# Altium PCB MT-20S4A.PcbDoc
Units mm, origin at the board's own origin, x right, y up, seen from the top; angles counter-clockwise.
Board outline 142 x 97 mm, 2 copper layers (Top Layer, Bottom Layer); 57 components, 71 nets, 348 pads, 324 vias.
Unrouted connection lines stored in the file: 32.
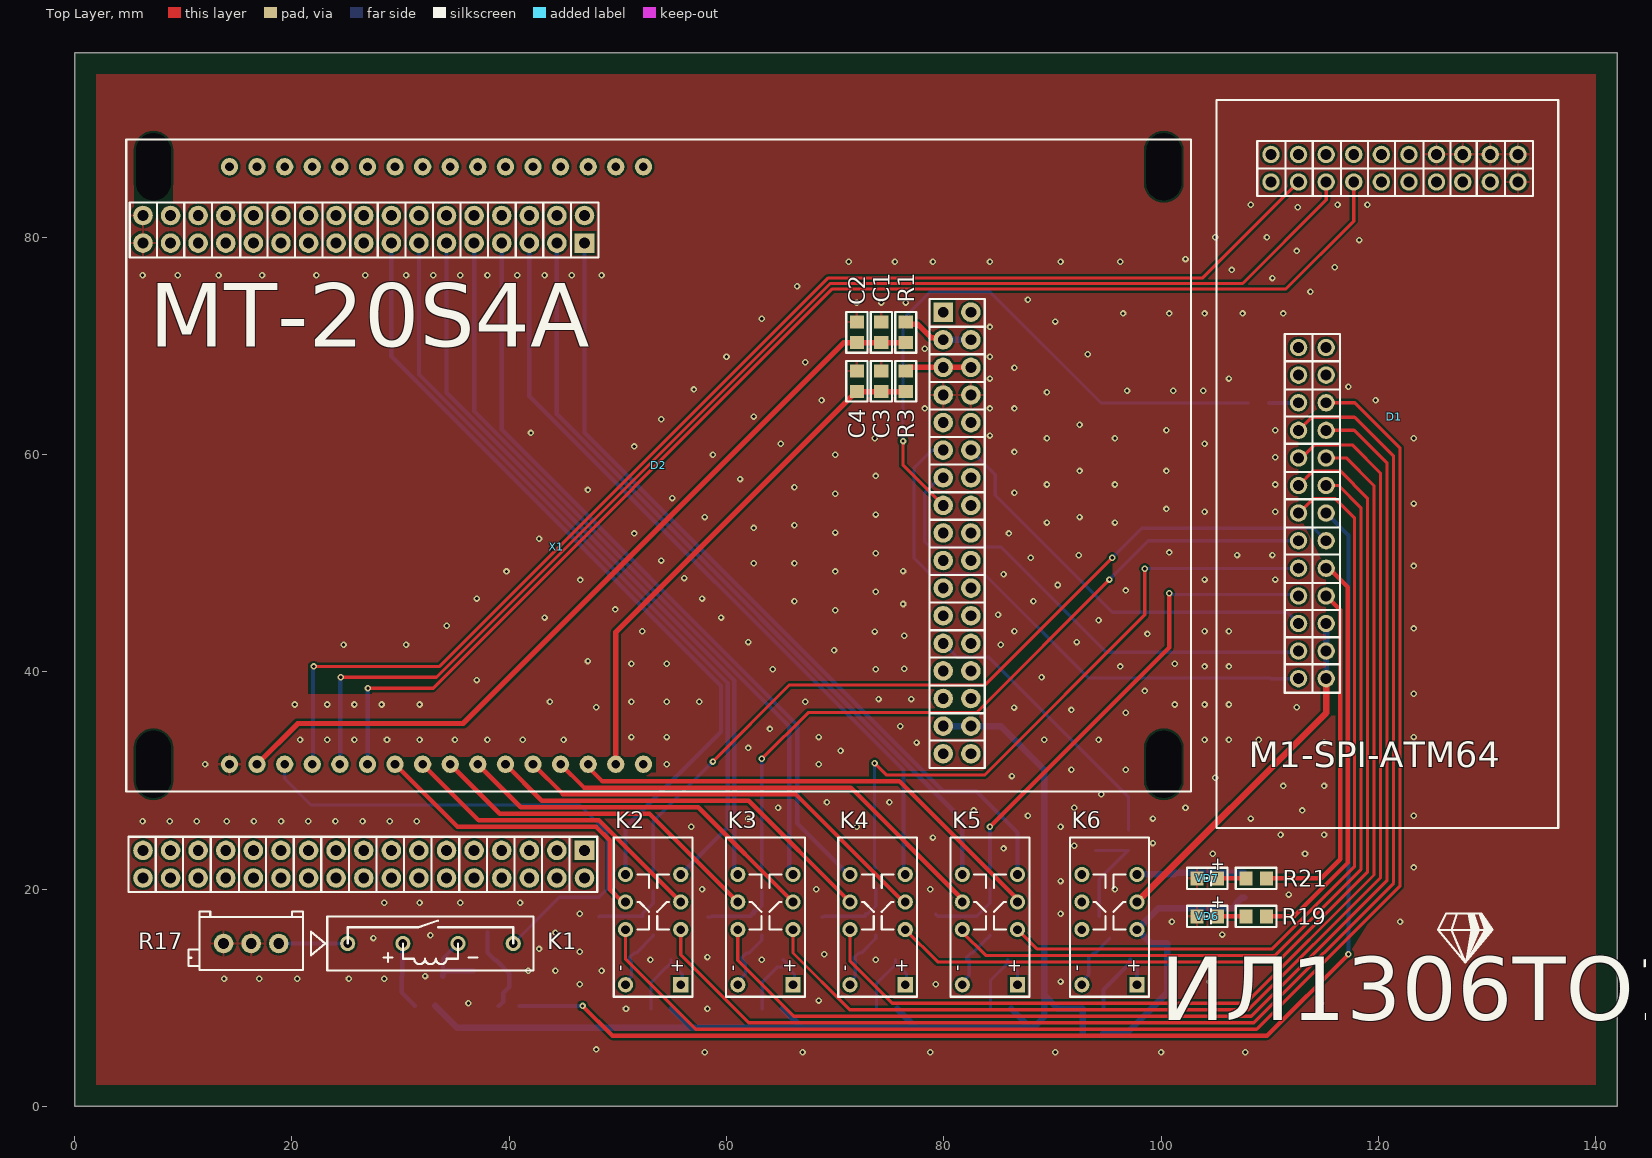
[diagram p0: Top Layer view]
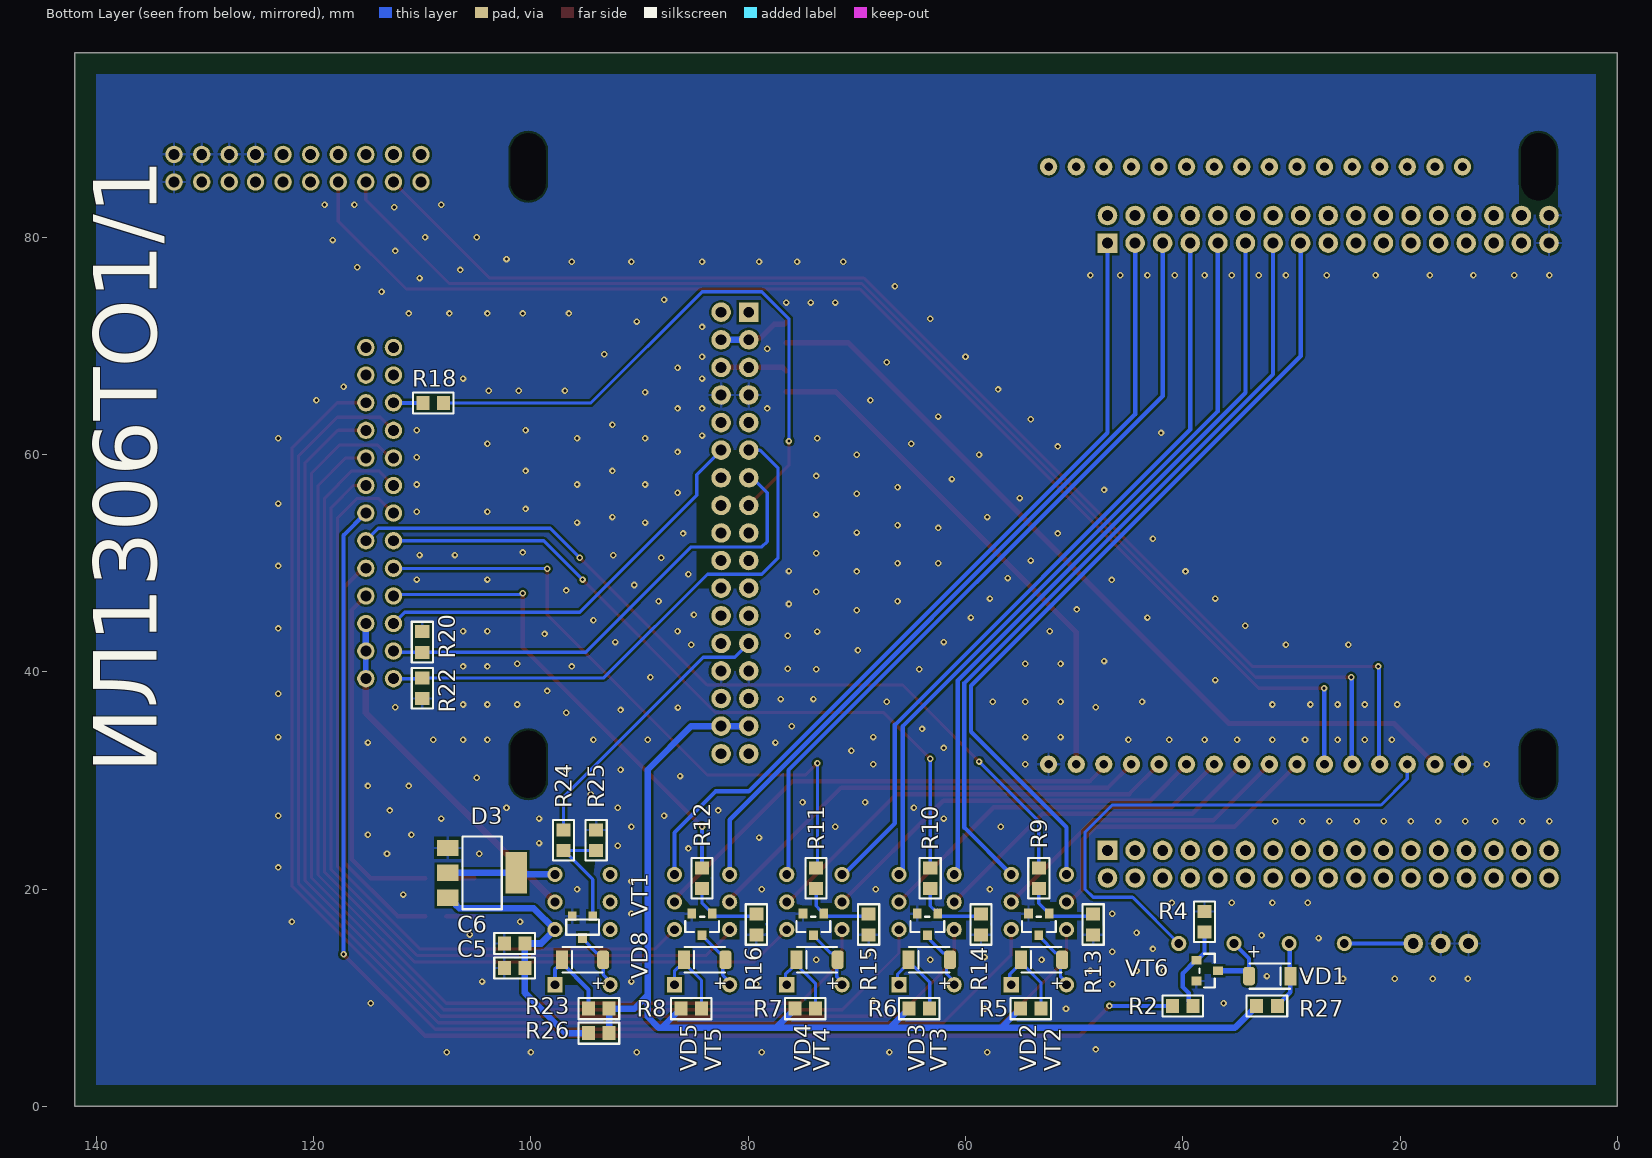
[diagram p1: Bottom Layer view, seen from below]

## Layer stack, top to bottom
Top Solder: solder mask 0.0102, Solder Resist, Dk 3.5
Top Layer: signal copper 0.0356
Dielectric 1: dielectric 0.32, FR-4, Dk 4.8
Bottom Layer: signal copper 0.0356
Bottom Solder: solder mask 0.0102, Solder Resist, Dk 3.5

## Board outline
0,0 142,0 142,97 0,97

## Design rules (kind name [scope] priority, off if disabled: settings)
Clearance [All] p1: gap=0.2 ignorepadtopadclearanceinfootprint=FALSE
HoleSize [All] p1: absolutevalues=TRUE maxlimit=10 minlimit=0.025 maxpercent=80.000 minpercent=20.000
PolygonConnect [All vs InNet('GND')  And  InComponentClass('All Components')] p1: connectstyle=Relief reliefconductorwidth=0.254 reliefentries=4 polygonreliefangle="90 Angle" airgapwidth=0.254
RoutingVias [All] p1: holewidth=0.6 width=1.2 viastyle="Through Hole" minholewidth=0.4 minwidth=0.8 maxholewidth=2.5 maxwidth=3
SilkToSilkClearance [All] p1: silktosilkclearance=0
SilkToSolderMaskClearance [IsPad] p1: minsilkscreentomaskgap=0 clearancetoexposedcopper=TRUE
SolderMaskExpansion [All] p1: expansion=0.102 istentingtop=FALSE
Width [All] p1: maxlimit=0.6 minlimit=0.3 preferedwidth=0.4
27 further rules are at their usual default settings.

## Classes and differential pairs
component class "Formula connector": X1

## Components (designator, comment, footprint, x,y, rotation, side; value= is the part's Value field where it differs from the comment)
C1 "47uF" 0805 74.25,71.25 r90 top
C2 "0.1uF" 0805 72,71.25 r90 top
C3 "10uF" 0805 74.25,66.75 r90 top
C4 "0.1uF" 0805 72,66.75 r90 top
C5 "10uF" 0805 101.5,12.75 r0 bottom
C6 "0.1uF" 0805 101.5,15 r0 bottom
D1 "M1-SPI-ATM64" M1-SPI-ATM64 112.657,85.097 r0 top locked
D2 "MT-20S4A" MT-20S4A 53.75,59 r0 top locked
D3 "LDO" SOT-223 104.5,21.5 r270 bottom
K1 "TRR1A05F00" TRR1A05F00 32.75,15 r0 top
K2 "V23079A1001B301 TE" V23079A1001B301 53.25,17.5 r90 top
K3 "V23079A1001B301 TE" V23079A1001B301 63.583,17.5 r90 top
K4 "V23079A1001B301 TE" V23079A1001B301 73.917,17.5 r90 top
K5 "V23079A1001B301 TE" V23079A1001B301 84.25,17.5 r90 top
K6 "V23079A1001B301 TE" V23079A1001B301 95.25,17.5 r90 top
R1 "0" 0805 76.5,71.25 r270 top
R2 "33k" 0805 40,9.25 r180 bottom
R3 "0" 0805 76.5,66.75 r270 top
R4 "20k" 0805 38,17 r270 bottom
R5 "33k" 0805 54,9 r180 bottom
R6 "33k" 0805 64.25,9 r180 bottom
R7 "33k" 0805 74.75,9 r180 bottom
R8 "33k" 0805 85.25,9 r180 bottom
R9 "4.7k" 0805 53.25,21 r270 bottom
R10 "4.7k" 0805 63.25,21 r270 bottom
R11 "4.7k" 0805 73.75,21 r270 bottom
R12 "4.7k" 0805 84.25,21 r270 bottom
R13 "20k" 0805 48.25,16.75 r270 bottom
R14 "20k" 0805 58.583,16.75 r270 bottom
R15 "20k" 0805 68.917,16.75 r270 bottom
R16 "20k" 0805 79.25,16.75 r270 bottom
R17 "3296X-1-503LF" 3296X-1-503LF 16.25,15 r0 top
R18 "100" 0805 109,64.75 r0 bottom
R19 "2.2k" 0805 108.75,17.5 r180 top
R20 "10k" 0805 110,42.75 r90 bottom
R21 "2.2k" 0805 108.75,21 r180 top
R22 "10k" 0805 110,38.5 r270 bottom
R23 "33k" 0805 93.75,9 r0 bottom
R24 "4.7k" 0805 97,24.5 r270 bottom
R25 "20k" 0805 94,24.5 r90 bottom
R26 "0" 0805 93.75,6.75 r0 bottom
R27 "33k" 0805 32.25,9.25 r180 bottom
VD1 "LL4148" SOD80C 32,12 r180 bottom
VD2 "LL4148 NXP" SOD80C 53,13.5 r0 bottom
VD3 "LL4148 NXP" SOD80C 63.333,13.5 r0 bottom
VD4 "LL4148 NXP" SOD80C 73.667,13.5 r0 bottom
VD5 "LL4148 NXP" SOD80C 84,13.5 r0 bottom
VD6 "LED(0805)" 0805(LED) 104.25,17.5 r180 top
VD7 "LED(0805)" 0805(LED) 104.25,21 r180 top
VD8 "LL4148 NXP" SOD80C 95.25,13.5 r0 bottom
VT1 "MMBT5551L" SOT-23#1 95.25,16.5 r0 bottom
VT2 "MMBT5551L" SOT-23#2 53.25,16.75 r0 bottom
VT3 "MMBT5551L" SOT-23#2 63.5,16.75 r0 bottom
VT4 "MMBT5551L" SOT-23#2 74,16.75 r0 bottom
VT5 "MMBT5551L" SOT-23#2 84.25,16.75 r0 bottom
VT6 "MMBT5551L" SOT-23#2 37.75,12.5 r270 bottom
X1 "FORMULA" FORMULA 34.75,50.25 r0 top locked

## Footprints (in the part's own frame and the unit in brackets; to place one, negate y for a bottom-side part, rotate by r counter-clockwise, add the part's x,y. Pads: shape width x height; smd on the part's side, far side on the other; paste and mask are expansions set on the pad)
0805 [mm]
  rect 1.2x1.3 smd: 1(-0.95,0) 2(0.95,0)
  silkscreen extent -1.87,-0.97 1.87,0.97, body extent -1.05,-0.63 0.95,0.63, height 0.55
0805(LED) [mm]
  rect 1.2x1.3 smd: 1(-0.95,0) 2(0.95,0)
  silkscreen extent -1.87,-0.97 1.87,0.97, body extent -1.03,-0.41 1.03,0.5, height 0.85
3296X-1-503LF [mm]
  round 1.8 hole 1: 1(2.54,0) 2(0,0) 3(-2.54,0)
  silkscreen extent -5.77,-2.45 4.76,2.95, body extent -6.34,-2.45 4.74,2.38, height 9.98
FORMULA [mm]
  rect 1.8x1.8 hole 1: 1(12.18,29.22) VDDF(12.18,-26.68) VEEF(45.2,22.86)
  round 1.8 hole 1: 2(9.64,29.22) 3(7.1,29.22) 4(4.56,29.22) 5(2.02,29.22) 6(-0.52,29.22) 7(-3.06,29.22) 8(-5.6,29.22) 9(-8.14,29.22) 10(-10.68,29.22) 11(-13.22,29.22) 12(-15.76,29.22) 13(-18.3,29.22) 14(-20.84,29.22) 15(-23.38,29.22) 16(-25.92,29.22) 17(12.18,31.76) 18(9.64,31.76) 19(7.1,31.76) 20(4.56,31.76) 21(2.02,31.76) 22(-0.52,31.76) 23(-3.06,31.76) 24(-5.6,31.76) 25(-8.14,31.76) 26(-10.68,31.76) 27(-13.22,31.76) 28(-15.76,31.76) 29(-18.3,31.76) 30(-20.84,31.76) 31(-23.38,31.76) 32(-25.92,31.76) 33(-28.46,-29.22) 34(-25.92,-29.22) 35(-23.38,-29.22) 36(-20.84,-29.22) 37(-18.3,-29.22) 38(-15.76,-29.22) 39(-13.22,-29.22) 40(-10.68,-29.22) 41(-8.14,-29.22) 42(-5.6,-29.22) 43(-3.06,-29.22) 44(-0.52,-29.22) 45(2.02,-29.22) 46(4.56,-29.22) 47(7.1,-29.22) 48(9.64,-29.22) 49(-28.46,-26.68) 50(-25.92,-26.68) 51(-23.38,-26.68) 52(-20.84,-26.68) 53(-18.3,-26.68) 54(-15.76,-26.68) 55(-13.22,-26.68) 56(-10.68,-26.68) 57(-8.14,-26.68) 58(-5.6,-26.68) 59(-3.06,-26.68) 60(-0.52,-26.68) 61(2.02,-26.68) 62(4.56,-26.68) 63(7.1,-26.68) 64(9.64,-26.68) +5V(45.2,-15.24) +5V(47.74,-15.24) +5V_VCCF(45.2,20.32) +5V_VCCS(47.74,20.32) +5V_VDDF(45.2,17.78) +5V_VDDS(47.74,17.78) +12V(45.2,-12.7) +12V(47.74,-12.7) -12V(45.2,-17.78) -12V(47.74,-17.78) GND(-28.46,29.22) GND(-28.46,31.76) GND(45.2,-10.16) GND(45.2,15.24) GND(47.74,-10.16) GND(47.74,15.24) IN-OUT1(47.74,10.16) IN-OUT2(47.74,7.62) IN-OUT3(47.74,5.08) IN-OUT4(47.74,2.54) IN-OUT5(47.74,0) IN-OUT6(47.74,-2.54) IN-OUT7(47.74,-5.08) IN-OUT8(47.74,-7.62) NC(45.2,12.7) NC(47.74,12.7) OUT1(45.2,10.16) OUT2(45.2,7.62) OUT3(45.2,5.08) OUT4(45.2,2.54) OUT5(45.2,0) OUT6(45.2,-2.54) OUT7(45.2,-5.08) OUT8(45.2,-7.62) VDDS(12.18,-29.22) VEES(47.74,22.86)
  silkscreen extent -29.8,-30.51 49.02,32.97, body extent -29.79,-30.4 48.98,32.92, height 3
M1-SPI-ATM64 [mm]
  round 1.6 hole 1: 1(-2.54,2.54) 2(-2.54,0) 3(0,2.54) 4(0,0) 5(2.54,2.54) 6(2.54,0) 7(5.08,2.54) 8(5.08,0) 9(7.62,2.54) 10(7.62,0) 11(10.16,2.54) 12(10.16,0) 13(12.7,2.54) 14(12.7,0) 15(15.11,2.54) 16(15.11,0) 17(17.65,2.54) 18(17.65,0) 19(20.19,2.54) 20(20.19,0) 21(0,-15.24) 22(2.54,-15.24) 23(0,-17.78) 24(2.54,-17.78) 25(0,-20.32) 26(2.54,-20.32) 27(0,-22.86) 28(2.54,-22.86) 29(0,-25.4) 30(2.54,-25.4) 31(0,-27.94) 32(2.54,-27.94) 33(0,-30.48) 34(2.54,-30.48) 35(0,-33.02) 36(2.54,-33.02) 37(0,-35.56) 38(2.54,-35.56) 39(0,-38.1) 40(2.54,-38.1) 41(0,-40.64) 42(2.54,-40.64) 43(0,-43.18) 44(2.54,-43.18) 45(0,-45.72) 46(2.54,-45.72)
  silkscreen extent -7.54,-59.46 23.9,7.54, body extent -4.06,-47.27 21.84,3.7, height 8.5
MT-20S4A [mm]
  round 1.6 hole 0.8: 1(-39.5,27.5) 2(-36.96,27.5) 3(-34.42,27.5) 4(-31.88,27.5) 5(-29.34,27.5) 6(-26.8,27.5) 7(-24.26,27.5) 8(-21.72,27.5) 9(-19.18,27.5) 10(-16.64,27.5) 11(-14.1,27.5) 12(-11.56,27.5) 13(-9.02,27.5) 14(-6.48,27.5) 15(-3.94,27.5) 16(-1.4,27.5) 17(-39.5,-27.5) 18(-36.96,-27.5) 19(-34.42,-27.5) 20(-31.88,-27.5) 21(-29.34,-27.5) 22(-26.8,-27.5) 23(-24.26,-27.5) 24(-21.72,-27.5) 25(-19.18,-27.5) 26(-16.64,-27.5) 27(-14.1,-27.5) 28(-11.56,-27.5) 29(-9.02,-27.5) 30(-6.48,-27.5) 31(-3.94,-27.5) 32(-1.4,-27.5)
  round 0 hole 3.2 slot 6.2 at 90 deg unplated: ""(-46.5,-27.5) ""(-46.5,27.5) ""(46.5,-27.5)
  rrect0% 0x0 hole 3.2 slot 6.2 at 90 deg unplated: ""(46.5,27.5)
  silkscreen extent -49,-30 49,30, body extent -40.43,-28.43 -0.52,28.46, height 9.6
SOD80C [mm]
  rrect50% 1.1x1.7 smd: 1(-1.9,0)
  rect 1.1x1.7 smd: 2(1.9,0)
  silkscreen extent -1.85,-1.17 1.85,1.17, body extent -1.9,-0.8 1.8,0.8, height 1.55
SOT-23#1 [mm]
  rect 0.8x0.9 smd: 1(-0.95,-1) 2(0.95,-1) 3(0,1)
  silkscreen extent -1.5,-0.7 1.5,0.7, body extent -1.5,-1.15 1.5,1.15, height 1.09
SOT-23#2 [mm]
  rect 0.8x0.9 smd: 1(-0.95,-1) 1(-0.95,-1) 2(0.95,-1) 2(0.95,-1) 3(0,1) 3(0,1)
  silkscreen extent -1.55,-0.72 1.55,0.7, body extent -1.5,-1.25 1.5,1.25, height 1.05
SOT-223 [mm]
  rect 1.5x2 smd: 1(-2.3,-3.15) 2(0,-3.15) 3(2.3,-3.15)
  rect 3.8x2 smd: 2(0,3.15)
  silkscreen extent -3.35,-1.79 3.35,1.81, body extent -3.25,-3.48 3.25,3.48, height 1.4
TRR1A05F00 [mm]
  round 1.4 hole 0.8: 1(-7.62,0) 3(-2.54,0) 5(2.54,0) 7(7.62,0)
  silkscreen extent -11,-2.5 9.5,2.5, body extent -9.47,-2.64 9.53,2.39, height 7.64
V23079A1001B301 [mm]
  rect 1.4x1.4 hole 0.8: 1(-6.3,-2.54)
  round 1.4 hole 0.8: 3(-1.22,-2.54) 4(1.32,-2.54) 5(3.86,-2.54) 8(3.86,2.54) 9(1.32,2.54) 10(-1.22,2.54) 12(-6.3,2.54)
  silkscreen extent -7.4,-3.63 7.25,3.63, body extent -7.25,-3.6 7.25,3.6, height 9.4

## Part data
C1 C2 C3 C4 C5 C6: library part C0805, ComponentHeigt=1.3, Firme=AVX, KIND=Конденсатор, Leadform=SMD, Packaging=0805
D3: library part "AMS1117-3.3 (SOT-223)"
R1 R2 R3 R5 R6 R7 R8 R9 R10 R11 R12 R13 R14 R15 R16 R18 R19 R20 R21 R22 R23 R24 R25 R26 R27: library part "R0805 Yageo", ComponentHeigt=0.6, Firme=Yageo, KIND=Резистор, Leadform=SMD, Packaging=0805
R4: library part "RC0805 Yageo", ComponentHeigt=0.6, Firme=Yageo, KIND=Резистор, Leadform=SMD, Packaging=0805
VD1: library part "BAS32L (SOD-80C)"
R17: ComponentHeigt=0.6, Firme=Yageo, KIND=Резистор, Leadform=SMD, Packaging=0805
VD2 VD3 VD4 VD5 VD8: Component Link=http://www.nxp.com, ComponentHeigt=1.6, Firme=NXP, KIND="Диод LL4148 NXP", Leadform=SMD, NN=24009301, Packaging=SOD-80C
VD6 VD7: ComponentHeigt=0.75, Firme=Kingbright, KIND="Светодиод L-1154GD Kingbright", Leadform="в отверстия", NN=24003000
VT1 VT2 VT3 VT4 VT5 VT6: ComponentHeigt=1.1, Firme=ONS, KIND="Транзистор MMBT5551L*G ONS", Leadform=SMD, NN=24007468, Packaging=SOT-23

## Via types
v1: diameter 0.6, hole 0.3, Top Layer to Bottom Layer, tented both sides, 318 vias
v2: diameter 0.6, hole 0.3, Top Layer to Bottom Layer, 6 vias

## Nets (pads, with @x,y where several pads share a name; then routed paths per layer and width w, separated by ;. In a path a pad name is that pad's centre, name@x,y a point inside that pad or via, vN(x,y) a via of type N, cw(c..) or ccw(c..) an arc to the next point about the centre after c; other vN are vias at no path point)
3.3V_MK: D3.2 K6.5 | length 9.9
  Bottom Layer w0.6: K6.5 101.21,21.36 101.35,21.5 D3.2@107.65,21.5
+5V_CONST: R5.1 R6.1 R7.1 R8.1 R23.1 R26.1 R27.1 X1.+5V | length 107.2
  Bottom Layer w0.6: R27.1 35.2,7.25 56.7,7.25 ; R5.1 56.7,7.25 ; R6.1 66.95,7.25 ; R7.1 77.45,7.25 ; X1.+5V@79.95,35.01 82.49,35.01 85.24,35.01 89.25,31 89.25,10.25 ; R8.1 87.95,7.25 ; R26.1 R23.1 90.5,9 89.25,10.25 ; 56.7,7.25 66.95,7.25 ; 66.95,7.25 77.45,7.25 ; 77.45,7.25 87.95,7.25 ; 87.95,7.25 88.25,7.25 89.25,8.25 89.25,10.25
+5V_VCC: R1.1 X1.+5V_VCCF X1.+5V_VCCS | length 6.7
  Top Layer w0.5: R1.1 76.705,71.995 77.606,71.995 78.251,71.35 78.824,70.777 79.743,70.777 X1.+5V_VCCF
  Bottom Layer w0.6: X1.+5V_VCCF X1.+5V_VCCS
+5V_VDD: R3.1 X1.+5V_VDDF X1.+5V_VDDS | length 6.1
  Top Layer w0.5: R3.1 76.83,68.03 X1.+5V_VDDS
A0: D1.4 D2.20 | length 118.2
  Top Layer w0.3: v1(22,40.5) 33.586,40.5 69.336,76.25 103.81,76.25 D1.4
  Bottom Layer w0.4: D2.20 21.935,31.565 21.935,40.435 v1(22,40.5)
DB0: D2.23 K2.9 | length 29.1
  Top Layer w0.4: D2.23 35.24,25.75 48,25.75 49.25,24.5 49.25,20 50.43,18.82 K2.9
DB0_F: K2.8 X1.8 | length 74.3
  Bottom Layer w0.4: X1.8 29.15,69.079 59.5,38.729 59.5,34.5 50.71,25.71 K2.8
DB0_MC: D1.26 K2.10 | length 131
  Top Layer w0.3: K2.10 50.71,13.54 57.15,7.1 108.79,7.1 122,20.31 122,60.599 117.822,64.777 D1.26
DB1: D2.24 K2.4 | length 29
  Top Layer w0.4: D2.24 37.18,26.35 48.26,26.35 K2.4
DB1_F: K2.5 X1.7 | length 71.7
  Bottom Layer w0.4: X1.7 31.69,67.387 60.1,38.977 60.1,25.67 K2.5
DB1_MC: D1.27 K2.3 | length 125.9
  Top Layer w0.3: K2.3 55.79,13.96 57.75,12 62.05,7.7 108.541,7.7 121.4,20.559 121.4,59.85 117.813,63.437 115.694,63.437 113.857,63.437 D1.27
DB2: D2.25 K3.9 | length 31.7
  Top Layer w0.4: D2.25 39.12,26.95 52.913,26.95 K3.9
DB2_F: K3.8 X1.6 | length 69.1
  Bottom Layer w0.4: X1.6 34.23,65.696 60.71,39.216 K3.8@60.71,21.36
DB2_MC: D1.28 K3.10 | length 115.2
  Top Layer w0.3: K3.10 61.043,13.457 66.2,8.3 108.293,8.3 120.8,20.807 120.8,59.2 117.763,62.237 D1.28
DB3: D2.26 K3.4 | length 34.3
  Top Layer w0.4: D2.26 41.06,27.55 57.393,27.55 K3.4
DB3_F: K3.5 X1.5 | length 70.1
  Bottom Layer w0.4: X1.5 36.77,64.004 65.79,34.984 K3.5@65.79,21.36
DB3_MC: D1.29 K3.3 | length 109.8
  Top Layer w0.3: K3.3 66.123,14.127 71.35,8.9 108.044,8.9 120.2,21.056 120.2,58.3 117.603,60.897 115.694,60.897 114.147,60.897 112.947,59.697 D1.29
DB4: D2.27 K4.9 | length 37
  Top Layer w0.4: D2.27 43,28.15 62.047,28.15 K4.9
DB4_F: K4.8 X1.4 | length 71.3
  Bottom Layer w0.4: X1.4 39.31,62.313 66.5,35.123 66.5,26.07 K4.8@71.21,21.36
DB4_MC: D1.30 K4.10 | length 98.9
  Top Layer w0.3: K4.10 71.377,13.373 75.25,9.5 107.796,9.5 119.6,21.304 119.6,57.15 117.053,59.697 D1.30
DB5: D2.28 K4.4 | length 39.4
  Top Layer w0.4: D2.28 44.94,28.75 66.36,28.75 K4.4@76.29,18.82
DB5_F: K4.5 X1.3 | length 72.4
  Bottom Layer w0.4: X1.3 41.85,65.4 76.29,30.96 K4.5@76.29,21.36
DB5_MC: D1.31 K4.3 | length 89.6
  Top Layer w0.3: K4.3 79.437,13.3 110.747,13.3 119,21.553 119,56 116.5,58.5 115.697,58.5 115.694,58.497 114.003,58.497 114,58.5 D1.31
DB6: D2.29 K5.9 | length 42.1
  Top Layer w0.4: D2.29 46.88,29.35 71.43,29.35 K5.9@81.71,19.07
DB6_F: K5.8 X1.2 | length 73.3
  Bottom Layer w0.4: X1.2 44.39,63.709 81.71,26.389 K5.8@81.71,21.61
DB6_MC: D1.32 K5.10 | length 78.2
  Top Layer w0.3: K5.10@81.71,16.04 83.85,13.9 110.499,13.9 118.4,21.801 118.4,55.1 116.343,57.157 D1.32
DB7: D2.30 K5.4 | length 44.7
  Top Layer w0.4: D2.30@47.52,31.5 47.52,30.98 48.55,29.95 75.91,29.95 K5.4@86.79,19.07
DB7_F: K5.5 X1.1 | length 76.2
  Bottom Layer w0.4: X1.1 46.93,62.017 79.947,29 83,29 86.79,25.21 K5.5@86.79,21.61
DB7_MC: D1.33 K5.3 | length 73.4
  Top Layer w0.3: K5.3@86.79,16.21 86.86,16.21 88.57,14.5 110.25,14.5 117.8,22.05 117.8,54.2 116.043,55.957 115.694,55.957 114.7,55.957 113.997,55.957 D1.33
DI1_MC: D1.41 X1.IN-OUT1 | length 37.9
  Bottom Layer w0.3: X1.IN-OUT1 84.75,58.15 84.75,56.25 95.5,45.5 111.614,45.5 D1.41
DO1_MC: D1.45 R22.1 X1.OUT1 | length 51.7
  Bottom Layer w0.3: X1.OUT1 78.91,60.41 77.25,58.75 77.25,50.5 78.75,49 83.75,49 93.3,39.45 R22.1 110.073,39.377 D1.45
DO2_MC: D1.43 R20.1 X1.OUT2 | length 45.4
  Bottom Layer w0.3: X1.OUT2 79.62,57.87 78.25,56.5 78.25,52 78.75,51.5 85.25,51.5 94.95,41.8 R20.1 112.54,41.8 D1.43
ENABLE: D1.8 D2.22 | length 119.2
  Top Layer w0.3: v1(27,38.5) 33,38.5 69.75,75.25 111.5,75.25 117.737,81.487 D1.8
  Bottom Layer w0.4: D2.22 26.975,31.525 26.975,38.475 v1(27,38.5)
GND: C1.2 C2.2 C3.2 C4.2 C5.2 C6.2 D1.13 D1.15 D1.17 D1.19 D1.20 D2.17 D2.32 D3.1 R4.1 R13.2 R14.2 R15.2 R16.2 R17.2 R17.3 R20.2 R22.2 R25.2 VD6.2 VD7.2 VT1.2 VT2.2 VT3.2 VT4.2 VT5.2 VT6.2 X1.GND
  other v1: 58,5 67,5 78.75,5 90.25,5 100,5 107.75,5 48,5.25 50.75,9 58.25,9 36.25,9.5 114.75,9.5 68.5,9.75 46.5,11.25 79.25,11.25 90.75,11.5 104.5,11.5 13.75,11.75 17,11.75 20.5,11.75 25.25,11.75 28.5,11.75 41.75,12.5 44.25,12.5 48.5,12.5 58.25,13.75 69,14 46.5,14.25 42.75,14.5 27.5,15.5 32.75,15.75 105.627,15.822 44.25,16 101,17 122,17 46.5,17.75 90.75,17.75 28.5,18.75 31.75,18.75 35.5,18.75 41,18.75 111.75,19.5 57.75,20 68.25,20 78.75,20 90.75,20.75 123.25,22 104.75,23.25 113.25,23.25 85.5,23.75 92,24 99.25,24.25 79,24.75 111,25 115,25 56.75,25.75 72,25.75 90.75,25.75 6.25,26.25 8.75,26.25 11.25,26.25 14,26.25 16.5,26.25 19,26.25 21.5,26.25 24,26.25 26.5,26.25 29,26.25 31.5,26.25 62,26.5 99.25,26.5 108.25,26.5 87.75,26.75 123.25,26.75 82.75,27.25 113,27.25 64.75,27.5 92,27.5 102.25,27.5 69.25,28 75,28 94.5,28.75 111.25,29.5 115,29.5 105,30.25 86.273,30.411 91.75,31 96.75,31 12,31.5 54.5,31.5 68.5,31.5 70.5,32.75 62,33 77.5,33.5 115,33.5 20.75,33.75 23.25,33.75 25.75,33.75 28.75,33.75 31.75,33.75 35,33.75 38,33.75 41.25,33.75 45,33.75 89.25,33.75 94.25,33.75 104,33.75 106.25,33.75 109,33.75 51.25,34 54.5,34 68.5,34 123.25,34 64,34.75 76,35 96.75,36.25 91.75,36.5 86.47,36.72 48,36.75 112.5,36.75 20.25,37 23.25,37 25.75,37 28.25,37 31.75,37 101.25,37 104,37 106.25,37 43.75,37.25 51.25,37.25 54.5,37.25 57.5,37.25 67.25,37.25 74,37.5 77,37.5 123.25,38 98.5,38.25 37,39.25 89,39.5 64.25,40.25 73.75,40.25 76.35,40.283 96.25,40.5 104,40.5 106.25,40.5 51.25,40.75 54.5,40.75 101.25,40.75 47.25,41 69.9,41.99 24.75,42.5 30.5,42.5 85.25,42.5 62,42.75 92.25,42.75 76.35,43.317 98.75,43.5 73.65,43.708 52.25,43.75 86.5,43.75 104,43.75 106.25,43.75 123.25,44 34.25,44.25 94.25,44.75 43.25,45 59.5,45 85,45.25 70,45.67 49.75,45.75 76.25,46.25 66.25,46.5 88.25,46.5 37,46.75 57.75,46.75 73.75,47.367 96.75,47.5 90.5,48 46.53,48.47 104,48.5 110.5,48.5 56.111,48.639 85.5,49 39.75,49.25 70,49.25 76.25,49.283 123.25,49.75 62.5,50 66.25,50 54,50.25 88,50.5 92.42,50.746 107,50.75 110.25,50.75 73.75,50.925 100.75,51 42.75,52.25 51.5,52.75 86,52.75 70,52.83 62.5,53.25 66.25,53.5 89.5,53.75 95.75,53.75 58,54.25 92.5,54.25 73.75,54.483 104,54.75 110.5,54.75 100.5,55 123.25,55.5 55,56 70,56.41 86.5,56.5 47.25,56.75 66.25,57 89.5,57.25 95.75,57.25 110.5,57.25 61.25,57.75 73.75,58.042 92.5,58.5 100.5,58.5 110.5,59.75 58.75,60 70,59.99 86.5,60.25 51.5,60.75 65,61 104,61 73.65,61.5 89.5,61.5 95.75,61.5 123.25,61.5 84.25,61.75 42,62 100.5,62.25 110.5,62.25 92.5,62.75 54,63.25 62.5,63.5 84.25,64.25 86.5,64.25 68.75,65 119.75,65 89.5,65.75 96.873,65.88 101.123,65.877 103.873,65.877 57,66 117.25,66.25 84.25,67 106.25,67 86.5,68 67.25,68.5 60,69 84.25,69 93.25,69.25 78.25,69.75 84.25,71.75 90.25,72.25 63.25,72.5 96.5,73 100.75,73 104,73 107.5,73 111.25,73 72,74 74.25,74 76.5,74 87.75,74.25 113.75,75 66.5,75.5 110.25,76.25 6.25,76.5 9.5,76.5 13.25,76.5 17.25,76.5 22.25,76.5 26.75,76.5 30.5,76.5 33,76.5 35.5,76.5 38,76.5 40.75,76.5 43.25,76.5 45.75,76.5 48.5,76.5 106.5,77 116,77.25 71.25,77.75 75.5,77.75 79,77.75 84.25,77.75 90.75,77.75 96.25,77.75 102.25,78 112.5,78.75 118.25,79.75 105,80 109.75,80 112.589,82.773 108.25,83 116.25,83 119,83
  other v2: 32.25,12 53,13.5 63.25,13.5 73.75,13.5 95.75,20 78.25,64.25
LED1: D1.38 R19.1 | length 37.6
  Top Layer w0.4: R19.1 112.25,17.5 117.2,22.45 117.2,47.8 115.463,49.537 D1.38
LED2: D1.40 R21.1 | length 32.3
  Top Layer w0.4: R21.1 114.75,21 116.5,22.75 116.5,45.694 D1.40
NetK1_1: K1.1 R17.1 | length 6.5
  Top Layer w0.4: K1.1 K1.1@25.21,15.08
  Bottom Layer w0.4: R17.1 K1.1
NetK1_3: K1.3 R27.2 VD1.2 | length 6.3
  Bottom Layer w0.4: K1.3 30.155,14.945 30.155,12.055 VD1.2 30.1,10.5 31.3,9.3 R27.2
NetK1_5: K1.5 VD1.1 VT6.3 | length 6.7
  Bottom Layer w0.4: VD1.1 33.9,13.61 K1.5
  Bottom Layer w0.5: VD1.1 33.9,12.202 34.198,12.5 VT6.3@36.7,12.5
NetK2_1: K2.1 R5.2 VD2.2 | length 7.6
  Bottom Layer w0.3: R5.2 53.05,11.4 54.45,12.8 54.5,12.8 54.75,13.05 VD2.2@54.75,13.1 ; VD2.2 54.9,13.2 55.3,12.8 55.926,12.174 55.926,11.336 K2.1
NetK2_12: K2.12 VD2.1 VT2.3 | length 5.8
  Bottom Layer w0.3: K2.12 50.71,11.386 51.25,11.926 51.25,13.35 VD2.1 51.1,13.732 51.49,14.123 51.673,14.123 53.25,15.7 VT2.3@53.25,15.75
NetK3_1: K3.1 R6.2 VD3.2 | length 8.1
  Bottom Layer w0.3: R6.2 63.3,11.437 64.705,12.842 65.192,12.842 VD3.2@65.5,13.15 ; VD3.2 65.542,13.192 65.542,12.892 66.259,12.174 66.259,11.336 K3.1
NetK3_12: K3.12 VD3.1 VT3.3 | length 5.9
  Bottom Layer w0.3: K3.12 61.043,11.498 61.75,12.204 61.75,13.183 VD3.1 61.433,13.732 61.824,14.123 62.056,14.123 63.25,15.317 VT3.3@63.25,15.75
NetK4_1: K4.1 R7.2 VD4.2 | length 7.7
  Bottom Layer w0.3: R7.2 73.8,11.3 VD4.2@75.65,13.15 ; VD4.2 75.567,13.183 75.583,13.183 75.967,12.8 75.967,12.783 76.576,12.174 76.576,11.319 K4.1
NetK4_12: K4.12 VD4.1 VT4.3 | length 5.8
  Bottom Layer w0.3: K4.12 71.377,11.461 71.85,11.934 VD4.1@71.85,13.6 ; VD4.1 71.767,13.732 72.157,14.123 72.389,14.123 73.717,15.45 73.75,15.45 VT4.3@73.75,15.75
NetK5_1: K5.1 R8.2 VD5.2 | length 7.2
  Bottom Layer w0.3: R8.2 84.3,11.6 85.9,13.2 VD5.2 ; VD5.2@86.15,13.1 86.15,12.95 86.3,12.8 86.45,12.8 86.79,12.46 K5.1@86.79,11.45
NetK5_12: K5.12 VD5.1 VT5.3 | length 5.6
  Bottom Layer w0.3: K5.12@81.71,11.45 82.35,12.09 VD5.1@82.35,13.5 ; VD5.1 82.1,13.732 82.49,14.123 82.623,14.123 83.95,15.45 84,15.45 84.25,15.7 VT5.3@84.25,15.75
NetK6_1: K6.1 R23.2 VD8.2 | length 8.1
  Bottom Layer w0.4: R23.2 94.7,10.75 VD8.2@97.15,13.2 ; K6.1 97.79,12.616 97.556,12.85 97.5,12.85 VD8.2@97.15,13.2 ; VD8.2@97.15,13.2 VD8.2 VD8.2@97.15,13.2
NetK6_12: K6.12 VD8.1 VT1.3 | length 5.5
  Bottom Layer w0.3: K6.12 92.71,11.498 93.35,12.138 93.35,13.732 93.74,14.123 93.923,14.123 95.25,15.45 VT1.3
NetR2_2: R2.2 R4.2 VT6.1 | length 8.1
  Bottom Layer w0.4: R4.2 38,14.15 38.7,13.45 38.75,13.45 38.8,13.45 40,12.25 40,11 39.45,10.45 39.45,9.65 R2.2
NetR9_2: R9.2 R13.1 VT2.1 | length 6.5
  Bottom Layer w0.3: R13.1@48.25,17.45 48.3,17.5 VT2.1@52.3,17.5 ; VT2.1@52.3,17.75 52.3,17.8 52.55,18.05 52.6,18.05 53.25,18.7 R9.2@53.25,19.8
NetR10_2: R10.2 R14.1 VT3.1 | length 7.1
  Bottom Layer w0.3: R14.1@58.25,17.45 58.583,17.45 58.633,17.5 62.3,17.5 62.3,17.8 62.55,18.05 VT3.1@62.6,18.05 ; VT3.1@62.55,17.75 62.55,17.8 62.8,18.05 62.85,18.05 63.25,18.45 R10.2@63.25,19.8
NetR11_2: R11.2 R15.1 VT4.1 | length 6.9
  Bottom Layer w0.3: R15.1@68.75,17.45 68.917,17.45 68.967,17.5 72.8,17.5 VT4.1@72.8,17.75 ; VT4.1@73.05,17.75 73.05,17.8 73.3,18.05 73.35,18.05 73.75,18.45 R11.2
NetR12_2: R12.2 R16.1 VT5.1 | length 6.9
  Bottom Layer w0.3: R16.1 79.45,17.5 83.05,17.5 84.25,18.7 R12.2
NetR19_2: R19.2 VD6.1 | length 2.6
  Top Layer w0.4: VD6.1 R19.2
NetR21_2: R21.2 VD7.1 | length 2.6
  Top Layer w0.4: VD7.1 R21.2
NetR24_2: R24.2 R25.1 VT1.1 | length 10.2
  Bottom Layer w0.3: R25.1@94.05,23.55 R25.1 R24.2@96.95,23.55 ; VT1.1 94.3,20.9 R24.2@96.95,23.55 ; R24.2 R24.2@96.95,23.55
ON_RELE1: D1.36 R9.1 | length 78.1
  Top Layer w0.3: v1(58.75,31.75) 65.8,38.8 83.8,38.8 v1(95.5,50.5)
  Bottom Layer w0.3: R9.1@53.25,21.7 53.25,26.25 v1(58.75,31.75) ; v1(95.5,50.5) 98.227,53.227 114.047,53.227 D1.36
ON_RELE2: D1.35 R10.1 | length 68
  Top Layer w0.3: v1(63.25,32) 67.51,36.26 83.01,36.26 v1(95.25,48.5)
  Bottom Layer w0.3: R10.1@63.25,21.7 v1(63.25,32) ; v1(95.25,48.5) 98.827,52.077 D1.35
ON_RELE3: D1.37 R11.1 | length 59.6
  Top Layer w0.3: v1(73.631,31.6) v1(73.631,31.6) 74.733,30.5 83.75,30.5 98.5,45.25 v1(98.5,49.5)
  Bottom Layer w0.3: v1(73.631,31.6) 73.631,22.069 R11.1 ; v1(98.5,49.5) 98.518,49.518 112.639,49.518 D1.37
ON_RELE4: D1.39 R12.1 | length 44.1
  Top Layer w0.4: v1(84.25,25.75) 100.75,42.25 v1(100.75,47.25)
  Bottom Layer w0.3: v1(100.75,47.25) 100.877,47.123 112.531,47.123 D1.39
  Bottom Layer w0.4: R12.1 v1(84.25,25.75)
ON_RELE5: D1.34 R2.1 | length 122
  Top Layer w0.4: v1(46.75,9.25) 49.5,6.5 109.75,6.5 v1(117.25,14)
  Bottom Layer w0.4: R2.1 v1(46.75,9.25) ; D1.34 117.25,52.564 v1(117.25,14)
ON_RELE6: R24.1 X1.OUT8 | length 26
  Bottom Layer w0.3: X1.OUT8 81.24,41.34 84.16,41.34 97,28.5 R24.1
R/W: D1.6 D2.21 | length 118.6
  Top Layer w0.3: v1(24.5,39.515) 33.308,39.515 69.543,75.75 107.5,75.75 115.197,83.447 D1.6
  Bottom Layer w0.4: D2.21 24.455,31.545 24.455,39.47 v1(24.5,39.515)
RST_IN: R18.1 X1.OUT3 | length 55.8
  Top Layer w0.3: v1(76.25,61.25) 76.25,59.03 X1.OUT3
  Bottom Layer w0.3: v1(76.25,61.25) 76.25,72.5 78.75,75 84.25,75 94.5,64.75 R18.1
RST_MC: D1.25 R18.2 | length 2.7
  Bottom Layer w0.4: R18.2 112.63,64.75 D1.25
U0: D2.19 K1.7 | length 49
  Bottom Layer w0.3: D2.19 19.33,30.17 21.75,27.75 46.5,27.75 49,25.25 49,20 48.25,19.25 44.62,19.25 K1.7
V_MC: D1.42 D1.44 D1.46 K6.4 | length 32.9
  Top Layer w0.6: K6.4 115.197,36.227 D1.46
  Bottom Layer w0.5: D1.44 D1.46 D1.46@115.2,39.374
  Bottom Layer w0.6: D1.44 D1.42
VCC_MT: C1.1 C2.1 D2.18 R1.2 | length 75.8
  Top Layer w0.5: D2.18 20.54,35.25 35.75,35.25 70.8,70.3 C2.1 ; C2.1@71.95,70.3 C1.1 R1.2
VCONST: C5.1 C6.1 D3.3 K6.3 R26.2 | length 26.4
  Bottom Layer w0.6: R26.2 96.85,6.75 100.55,10.45 C5.1 C6.1 99.07,15 K6.3 99.76,18.25 106.599,18.25 106.95,18.601 106.95,18.75 107.4,19.2 D3.3
VDD_MT: C3.1 C4.1 D2.31 R3.2 | length 48
  Top Layer w0.5: D2.31 49.81,43.66 71.95,65.8 C4.1 C3.1 R3.2
pads on no net: D1.1 D1.2 D1.3 D1.5 D1.7 D1.9 D1.10 D1.11 D1.12 D1.14 D1.16 D1.18 D1.21 D1.22 D1.23 D1.24 D2. D2.1 D2.2 D2.3 D2.4 D2.5 D2.6 D2.7 D2.8 D2.9 D2.10 D2.11 D2.12 D2.13 D2.14 D2.15 D2.16 K6.8 K6.9 K6.10 X1.9 X1.10 X1.11 X1.12 X1.13 X1.14 X1.15 X1.16 X1.17 X1.18 X1.19 X1.20 X1.21 X1.22 X1.23 X1.24 X1.25 X1.26 X1.27 X1.28 X1.29 X1.30 X1.31 X1.32 X1.33 X1.34 X1.35 X1.36 X1.37 X1.38 X1.39 X1.40 X1.41 X1.42 X1.43 X1.44 X1.45 X1.46 X1.47 X1.48 X1.49 X1.50 X1.51 X1.52 X1.53 X1.54 X1.55 X1.56 X1.57 X1.58 X1.59 X1.60 X1.61 X1.62 X1.63 X1.64 X1.+12V X1.-12V X1.IN-OUT2 X1.IN-OUT3 X1.IN-OUT4 X1.IN-OUT5 X1.IN-OUT6 X1.IN-OUT7 X1.IN-OUT8 X1.NC X1.OUT4 X1.OUT5 X1.OUT6 X1.OUT7 X1.VDDF X1.VDDS X1.VEEF X1.VEES

## Polygon pours and split planes (outlines as drawn)
GND on Top Layer "NONET_L-01_P-001" (solid, remove dead copper, pour order 0): 2,95 2,2 140,2 140,95
GND on Bottom Layer "NONET_L-01_P-001" (solid, remove dead copper, pour order 1): 2,95 2,2 140,2 140,95

## Other copper
Top Layer:
  pour cut-out: 73.131,31.699 73.131,29.875 75.25,29.875
  pour cut-out: 79.95,40.09 78.75,40.09 78.75,39
  pour cut-out: 82.49,40.09 83.652,40.09 83.652,39.157
  pour cut-out: 82.49,40.09 79.823,40.09 79.823,41.244 82.617,41.244
  pour cut-out: 80.095,33.91 82.49,33.91 82.49,35.01
  pour cut-out: 21.5,40.735 21.5,37.991 27.34,37.991
  pour cut-out: 72.904,68.554 73.346,68.554 73.346,66.873 72.989,66.873 72.904,66.958
  pour cut-out: 72.904,73.054 73.346,73.054 73.346,71.4 73.288,71.458 72.904,71.458
  pour cut-out: 75.154,68.554 75.596,68.554 75.65,68.5 75.65,66.9 75.238,66.9 75.154,66.984
  pour cut-out: 71.096,66.846 71.15,66.792 71.15,66.6 75.65,66.6 75.65,66.9
  pour cut-out: 75.65,71.4 75.65,73 75.596,73.054 75.154,73.054 75.154,71.484
  pour cut-out: 71.096,71.346 71.15,71.292 71.15,71.1 75.65,71.1 75.65,71.4
  pour cut-out: 77.35,66.9 77.35,66.6 75.65,66.6 75.65,66.9
  pour cut-out: 77.35,71.4 77.35,71.1 75.65,71.1 75.65,71.4
  pour cut-out: 108.6,18.35 108.9,18.35 108.9,16.65 108.6,16.65
  pour cut-out: 108.6,21.85 108.9,21.85 108.9,20.15 108.6,20.15
  pour cut-out: 112.657,54.617 115.197,54.617 115.197,49.537
  pour cut-out: 117.25,14 117.25,16.75 119,16.75
  pour cut-out: 115.197,46.997 115.197,36 117.75,36
  pour cut-out: 115.197,49.537 115.197,47 117.25,47
  pour cut-out: 113.019,63.175 115.197,63.175 115.197,64.777
  pour cut-out: 112.657,62.237 112.657,54.031 117.5,54.031 117.5,62.237
  pour cut-out: 5.476,84.647 5.476,82.135 9.024,82.135 9.024,84.647
  pour cut-out: 29.495,32.25 29.495,32.123 53.505,32.123 53.505,30.75
  pour cut-out: 95.5,50.5 95.5,48.5 95.25,48.5
Bottom Layer:
  pour cut-out: 32.1,10.1 32.4,10.1 32.4,8.4 32.1,8.4
  pour cut-out: 39.29,12.204 37.4,12.204 37.4,13.25 38.5,13.25
  pour cut-out: 84.75,51.5 84.75,47.71 79.95,47.71 78.613,48.67
  pour cut-out: 79.95,60.41 82.49,60.41 84.75,58.15 84.75,51.5 79,51.5
  pour cut-out: 108.85,65.6 108.85,63.9 109.15,63.9 109.15,65.6
  pour cut-out: 106.45,20.99 106.45,20.15 108.85,20.15 108.85,20.55
  pour cut-out: 93.6,7.6 93.6,5.9 93.9,5.9 93.9,7.6
  pour cut-out: 93.6,9.85 93.6,8.15 93.9,8.15 93.9,9.85
  pour cut-out: 101.35,13.6 101.35,11.846 101.596,11.846 101.596,13.654
  pour cut-out: 101.35,15.85 101.35,14.096 101.596,14.096 101.596,15.904
  pour cut-out: 93.096,24.596 93.096,24.35 94.904,24.35 94.904,24.596
  pour cut-out: 96.15,24.65 96.15,24.35 97.85,24.35 97.85,24.65
  pour cut-out: 84.601,18.535 84.601,17.1 83.75,17.1 83.75,18.5
  pour cut-out: 80.81,18.938 80.81,15.38 82.61,15.38 82.61,18.702
  pour cut-out: 76.575,17.92 74.823,17.92 74.823,18.454
  pour cut-out: 76.457,18.82 76.457,18.454 74.823,18.454
  pour cut-out: 71.813,18.702 73.393,18.702 73.393,18.598
  pour cut-out: 70.477,18.702 70.477,15.38 72.277,15.38 72.277,18.702
  pour cut-out: 63.796,18.454 63.15,18.454 63.15,17.046 63.796,17.046
  pour cut-out: 74.296,18.454 73.65,18.454 73.65,17.046 74.296,17.046
  pour cut-out: 62,17.5 62,16 61.162,15.38
  pour cut-out: 60,17.5 60,15.38 61.162,15.38
  pour cut-out: 60.75,13.5 60.75,11.851 61.397,11.851
  pour cut-out: 55.65,12.955 55.65,12.1 56.69,12.1
  pour cut-out: 52.25,20 52.25,18.517 52.563,18.517
  pour cut-out: 55.329,12.1 54,12.1 54,12.5
  pour cut-out: 49.75,17.25 49.75,15.38 51.7,15.38 51.7,17.143
  pour cut-out: 50.71,18.82 50.71,18.702 49.75,18.702 49.75,17.75
  pour cut-out: 50.71,18.82 52.445,18.82 52.445,18.4
  pour cut-out: 47.4,16.9 47.4,16.654 49.1,16.654 49.1,16.9
  pour cut-out: 53.546,17.877 53.546,17 52.25,17
  pour cut-out: 97.79,11.2 95.5,11.2 95.5,12.152
  pour cut-out: 94,23.55 94.3,23.55 94.3,20.9
  pour cut-out: 79.805,43.73 79.805,40.09 82.635,40.09 82.635,43.73
  pour cut-out: 5.476,84.647 5.476,82.137 9.024,82.137 9.024,84.647
  pour cut-out: 55.908,17.92 54.327,17.92 54.327,18.454
  pour cut-out: 55.79,18.82 55.79,18.454 54.327,18.454
  pour cut-out: 86.908,17.92 85.327,17.92 85.327,18.454
  pour cut-out: 86.237,19.54 86.237,18.454 85.327,18.454
  pour cut-out: 109.15,39.807 109.15,37.677 110.85,37.677 110.85,39.02
  pour cut-out: 109.096,43.573 109.096,42.157 110.904,42.157 110.904,43.573
  pour cut-out: 84.657,9.85 84.657,8.15 86.5,8.15 86.5,9.75
  pour cut-out: 83.5,22 83.5,20.25 85.25,20.25 85.25,22
  pour cut-out: 78.5,17.75 78.5,15.927 80.1,15.927 80.1,17.857
  pour cut-out: 74,9.75 74,8.15 75.75,8.15 75.75,9.75
  pour cut-out: 72.75,22 72.75,20.25 74.75,20.25 74.75,22
  pour cut-out: 68,17.75 68,15.927 69.767,15.927 69.767,17.857
  pour cut-out: 63.657,9.85 63.657,8.15 65.386,8.15 65.386,9.856
  pour cut-out: 62.25,22 62.25,20.25 64.275,20.25 64.275,21.98
  pour cut-out: 52.25,22 52.25,20 54.257,20 54.257,21.965
  pour cut-out: 57.75,17.75 57.75,15.927 59.444,15.927 59.444,17.61
  pour cut-out: 53.407,9.85 53.407,8.15 55.013,8.15 55.013,9.854
  pour cut-out: 39.358,10.1 41,10.1 41,8.25 39.25,8.25
  pour cut-out: 37,17.5 39,17.5 39,16.5 37,16.5

## Silkscreen, mask and mechanical layers (free items; w line width, h text height)
Top Overlay:
  region: 129.75,16.25 130.5,16.25 129.5,17.75 129.25,17.75
  region: 129.25,16.25 128.5,16.25 128.25,17.75 128.75,17.75
  region: 130.5,16.25 128,13.25 129.75,16.25
  region: 128,13.25 128.5,16.25 129.25,16.25
  lines w0.2: 127.25,17.75 126.75,16.25 128,13.25 ; 128.75,17.75 129.25,16.25 128,13.25 ; 125.5,16.25 130.5,16.25 ; 125.5,16.25 126.25,17.75 129.5,17.75 130.5,16.25 ; 125.5,16.25 128,13.25 ; 128,13.25 130.5,16.25
  text "MT-20S4A" at 6.863,68 h10
  text "ИЛ1306ТО1/1" at 99.923,6 h10
Bottom Overlay:
  text "ИЛ1306ТО1/1" at 132.5,30.673 h10 r270
Board:
  the board outline again, w0.2

## Dimensions
142,97 to 142,0 on Dimension
142,97 to 0,97 on Dimension

## Text inside footprints (layer, text, board x,y; h text height)
K2: Top Overlay "+" at 56.45,12.28 h2 r90; Top Overlay "-" at 51.14,12.43 h2 r90
K3: Top Overlay "+" at 66.783,12.28 h2 r90; Top Overlay "-" at 61.473,12.43 h2 r90
K4: Top Overlay "+" at 77.117,12.28 h2 r90; Top Overlay "-" at 71.807,12.43 h2 r90
K5: Top Overlay "+" at 87.45,12.28 h2 r90; Top Overlay "-" at 82.14,12.43 h2 r90
K6: Top Overlay "+" at 98.45,12.28 h2 r90; Top Overlay "-" at 93.14,12.43 h2 r90
VD1: Bottom Overlay "+" at 34.115,13.252 h2
VD2: Bottom Overlay "+" at 50.885,12.248 h2 r180
VD3: Bottom Overlay "+" at 61.218,12.248 h2 r180
VD4: Bottom Overlay "+" at 71.551,12.248 h2 r180
VD5: Bottom Overlay "+" at 81.885,12.248 h2 r180
VD6: Top Overlay "+" at 105.896,19.734 h2 r180
VD7: Top Overlay "+" at 105.896,23.234 h2 r180
VD8: Bottom Overlay "+" at 93.135,12.248 h2 r180